# EAGLE board part1b-astable-pot (EAGLE 9.7.0)

Size 110.92 x 68.14 mm. Coordinates in mm from the lower left corner, seen from the top.
Outline: 0,0 110.92,0 110.92,68.14 0,68.14 0,0
Copper layers (1*16): Top 0.035mm / dielectric 1.5mm / Bottom 0.035mm
Design rules "default": minimum track width 6mil, minimum drill 0.35mm, track to track 6mil, track to pad 6mil, pad to pad 6mil, via to via 6mil, smd to smd 6mil, copper to edge 40mil, drill to drill 6mil, minimum pad ring 10mil, minimum via ring 8mil, stop-mask expansion 4mil, vias tented up to drill 0mil, thermal gap 10mil

## Footprints (pad centres in the part's own frame; a part is rotated, then mirrored left to right if it is on the bottom)
CAP-THRU-2.54MM = drill 1.016 pad 1.88: 1 -1.27,0; 2 1.27,0
CAPPRD254W65D500H1150B = drill 0.85 pad 1.45: 1 -1.27,0; 2 1.27,0
LEDRD254W60D565H860B = drill 0.981 pad 1.581: 1 -1.27,0; 2 1.27,0
BATTERY-GENERIC = drill 1.118 pad 3.15 octagon: + 2.54,0; - -2.54,0
RESAD1016W63L850D250B = drill 0.83 pad 1.43: 1 -5.08,0; 2 5.08,0
HA-06-SM065 = drill 1 pad 1.676: 1 -2.54,-2.54; 2 0,2.54; 3 2.54,-2.54
DIP826W53P254L959H508Q8B = drill 0.786 pad 1.386: 1 -4.13,3.81; 2 -4.13,1.27; 3 -4.13,-1.27; 4 -4.13,-3.81; 5 4.13,-3.81; 6 4.13,-1.27; 7 4.13,1.27; 8 4.13,3.81

## Placement (x,y rotation side)
C1  0.1u  [CAP-THRU-2.54MM]  85.9,32.38 0 top
C2  0.1u  [CAP-THRU-2.54MM]  38.91,51.44 270 top
C3  1u  [CAPPRD254W65D500H1150B]  43.99,22.23 180 top
C4  0.1u  [CAP-THRU-2.54MM]  104.95,5.71 270 top
D1  RED  [LEDRD254W60D565H860B]  55.42,24.77 180 top
P1  BATTERYGENERIC  [BATTERY-GENERIC]  8.26,59.88 180 top
R1  1k  [RESAD1016W63L850D250B]  66.85,45.09 90 top
R3  220  [RESAD1016W63L850D250B]  54.15,12.06 90 top
R4  1k  [RESAD1016W63L850D250B]  56.69,40.01 0 top
RPOT1  1M  [HA-06-SM065]  54.15,42.55 0 top
U1  LM555_DIP  [DIP826W53P254L959H508Q8B]  68.12,28.57 90 top

## Library data of the parts
C1-C4 P1 R1 R3 R4 RPOT1 = Tinkercad
D1 = Tinkercad; CATEGORY: Opto-Electronic; SUB-CATEGORY: LED; VALUE: LED_RED
U1 = Tinkercad; CATEGORY: IC_Clock-Timing; CURRENT-SUPPLY: 10mA; DESCRIPTION: IC OSC SINGLE TIMER 100KHZ 8-DIP; FREQUENCY: 100kHz; MANUFACTURER: Texas Instruments; MPN: LM555CN/NOPB; OPERATING_TEMP: 0°C to 70°C; PART_STATUS: Active; ROHS_COMPLIANT: ROHS3 Compliant; SUB-CATEGORY: Timer

## Nets
D1_C: D1.2 R3.2
P1+: C1.2 C2.2 C4.2 P1.+ R1.2 U1.4 U1.8
P1-: C2.1 C3.2 C4.1 P1.- R3.1 U1.1
RPOT1_P$1: R4.1 RPOT1.1
U1_CV: C1.1 U1.5
U1_DIS: R1.1 R4.2 U1.7
U1_OUT: D1.1 U1.3
U1_TR: C3.1 RPOT1.2 U1.2 U1.6

## Tracks (layer width: path | path; a pad name or v marks a point on that pad's centre or on a via)
D1_C  (1 unrouted)
P1+  (6 unrouted)
P1-  (5 unrouted)
RPOT1_P$1  (1 unrouted)
U1_CV  (1 unrouted)
U1_DIS  (2 unrouted)
U1_OUT  (1 unrouted)
U1_TR  (3 unrouted)